# Altium PCB Main-Board-V1.1.PcbDoc (part 4 of 5)
Units mil, origin at the board's own origin, x right, y up, seen from the top; angles counter-clockwise.
Board outline 3599.72 x 1771.65 mil, 4 copper layers (Top Layer, Layer 1, Layer 2, Bottom Layer), stack 62.449 mil thick; 176 components, 132 nets, 634 pads, 296 vias.
Unrouted connection lines stored in the file: 17.
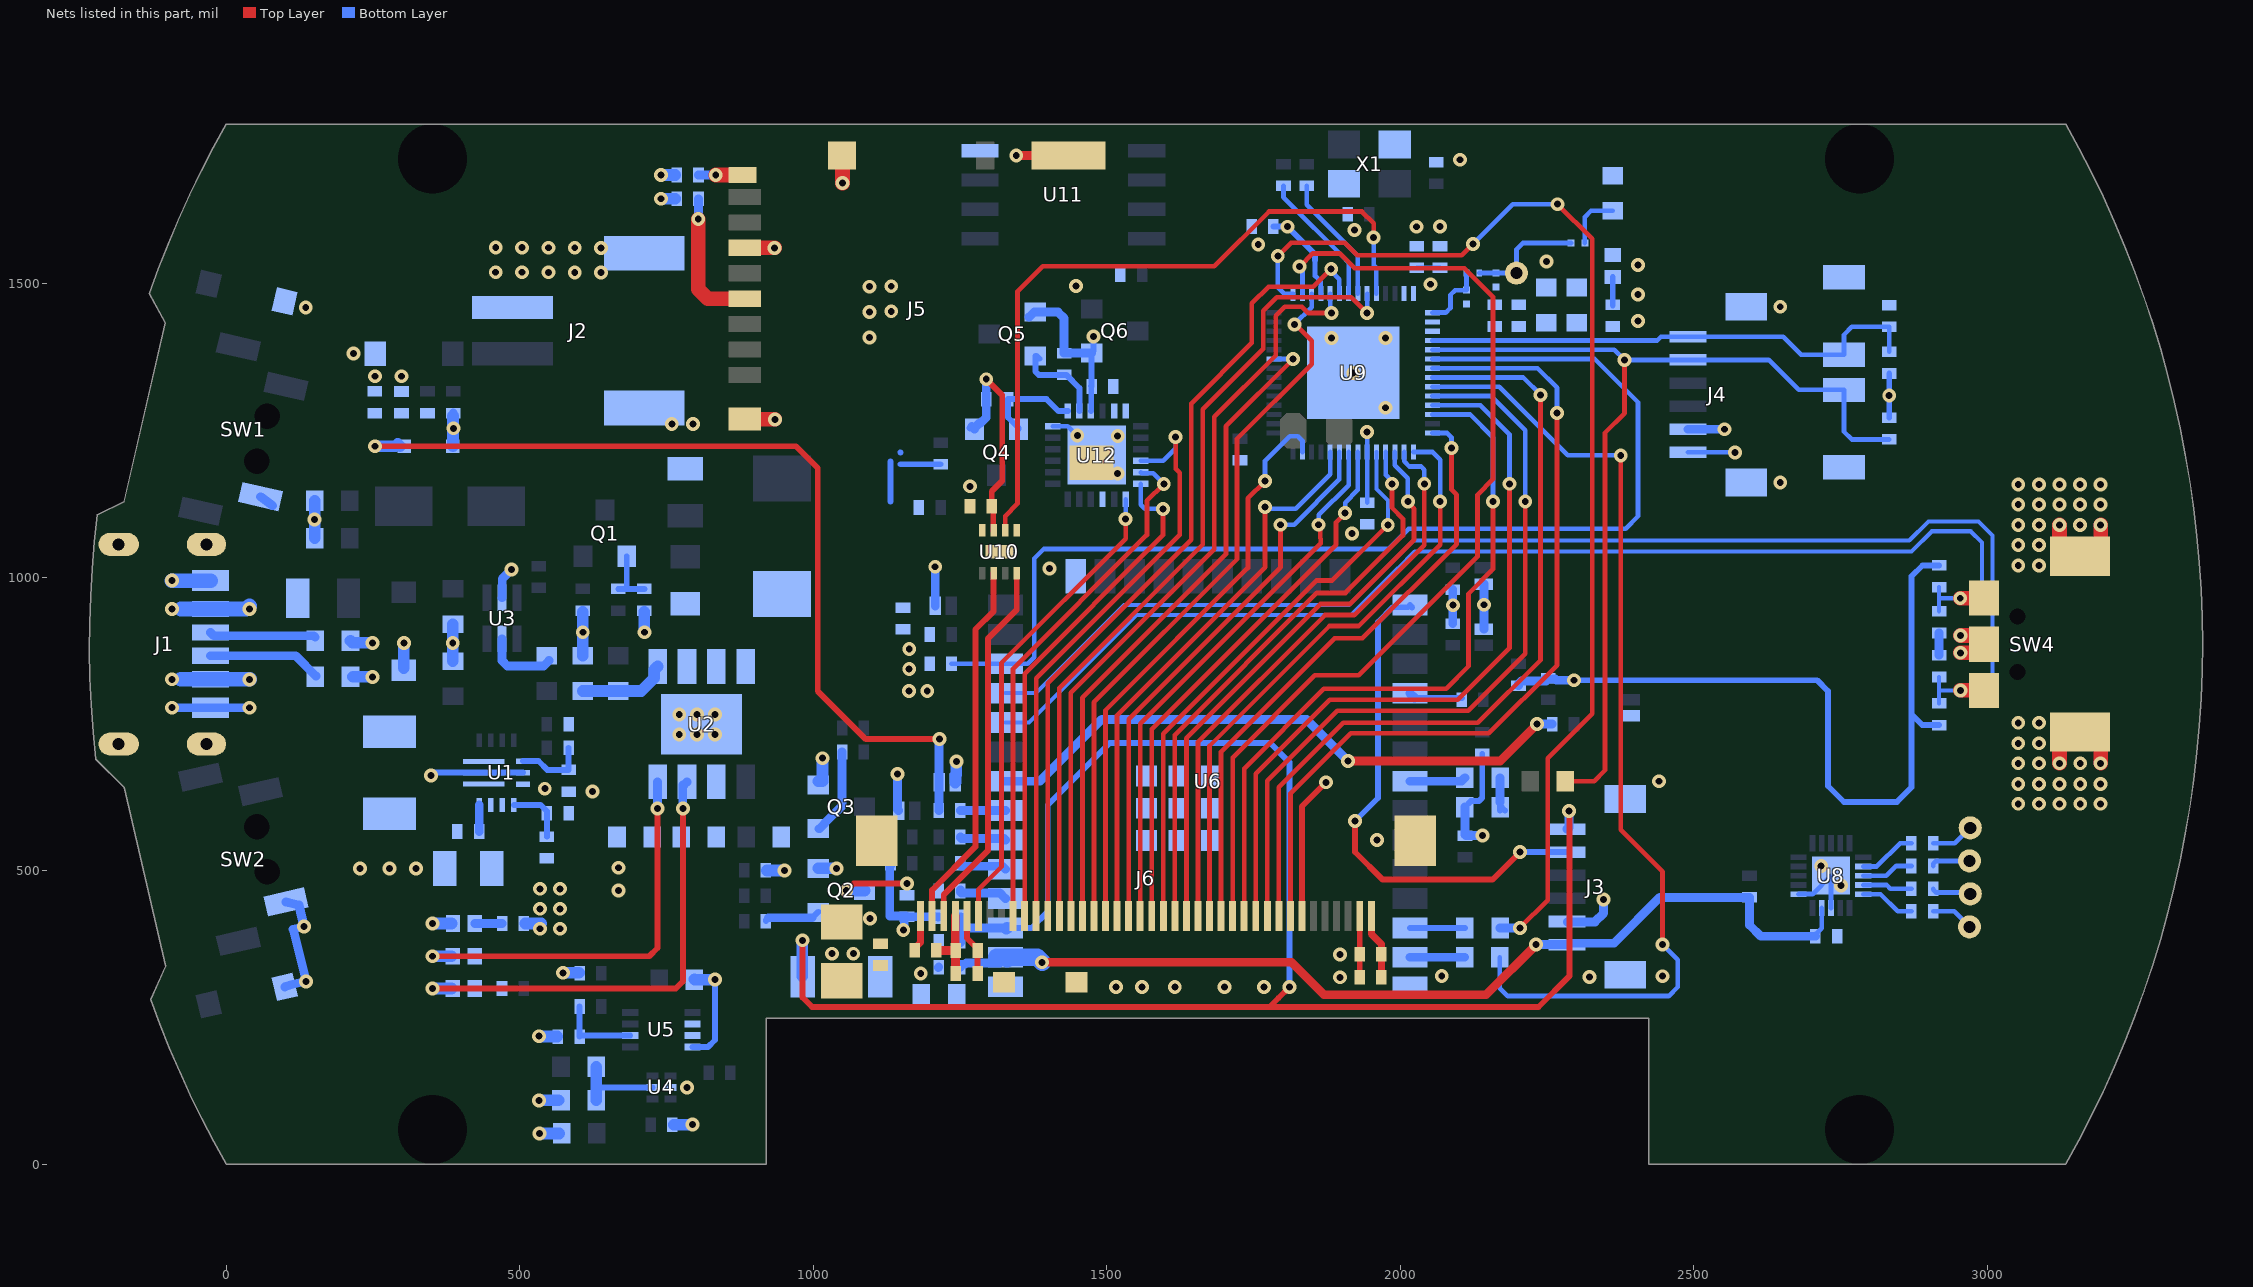
[diagram p4: the nets of this part, all layers, seen from the top]

## Via types
v1: diameter 23.62, hole 11.81, Top Layer to Bottom Layer, 296 vias

## Nets (pads, with @x,y where several pads share a name; then routed paths per layer and width w, separated by ;. In a path a pad name is that pad's centre, name@x,y a point inside that pad or via, vN(x,y) a via of type N, cw(c..) or ccw(c..) an arc to the next point about the centre after c; other vN are vias at no path point) (continued)
COM_UART_TX: (continued)
  Bottom Layer w8: U9.9@2054.84,1324.38 2168.33,1324.38 2285.24,1207.47 v1(2375.62,1207.47) ; R33.2@2169.69,352.36 2169.69,299.96 2183.21,286.44 2457.37,286.44 2472.75,301.82 2472.75,348.2 v1(2446.94,374.02)
EN: C19.1 J3.6 R32.1 SW3.1 U6.3 | length 3097.3
  Top Layer w10: v1(981.79,381.35) 981.79,284.17 998.15,267.8 1777.4,267.8 ; v1(1811.19,301.59) 1792.54,282.94 1777.4,267.8 ; v1(2287.7,601.91) 2288.15,601.46 2288.15,320.24 2235.71,267.8 1797.23,267.8 1777.4,267.8
  Bottom Layer w10: U6.3@1327.56,402.36 1329.98,402.36 1371.91,402.36 1399.54,429.99 1399.54,611.79 1505.21,717.46 1778.4,717.46 1811.19,684.67 v1(1811.19,301.59)
  Bottom Layer w15: v1@981.48,381.04 v1(981.79,381.35) ; C19.1@1250.82,377.36 C19.1@1250.82,379.51 1250.82,402.36 ; R32.1@1250.82,421.36 1250.82,402.36 ; U6.3@1327.56,402.36 1250.82,402.36 ; J3.6@2283.72,570.87 2285.36,570.87 2287.7,573.21 v1(2287.7,601.91)
  Bottom Layer w20: SW3.1@981.48,319.97 v1@981.48,381.04 ; U6.3@1328.77,401.15 1329.98,402.36 U6.3@1330.47,401.87
EN-2: C50.1 J4.6 R60.1 SW5.1 U9.4 | length 875.3
  Bottom Layer w8: U9.4@2054.84,1403.12 2437.94,1403.12 2444.24,1409.43 2652.45,1409.43 2682.88,1379 SW5.1@2756,1379 ; SW5.1@2755.57,1379.43 2756,1379.85 2756,1412.93 2769.53,1426.46 C50.1@2833.07,1426.45 R60.1@2833.08,1383.92
ENC_CHA: C23.2 R36.1 SW4.A U6.10 | length 2049.4
  Top Layer w15: SW4.A@2994.12,964 SW4.A@2994.69,964.57
  Top Layer w25: v1(2954,964) SW4.A@2994.12,964
  Bottom Layer w7: U6.10@1327.56,752.36 1367.66,752.36 1550.86,935.56 1915.95,935.56 1995.43,1015.05 1996.02,1015.05 2024.66,1043.69 2871.07,1043.69 2905.5,1078.12 2971.88,1078.12 2991,1059 2991,975.79 2979.21,964 v1(2954,964) 2918,964 ; C23.2@2918,941.87 2918,964 ; R36.1@2918,983 2918,964
ENC_CHB: C22.2 R35.1 SW4.B U6.11 | length 2243.8
  Top Layer w25: v1(2954.57,807.09) SW4.B@2994.69,807.09
  Bottom Layer w7: U6.11@1327.56,802.36 1379.73,802.36 1529.73,952.36 1912.95,952.36 2022.78,1062.19 2867.13,1062.19 2900.05,1095.12 2984.88,1095.12 3009,1071 3009,821.4 2994.69,807.09 v1(2954.57,807.09) 2918.51,807.09 ; R35.1@2918,785 C22.2@2918,829.93
GND: C1.1 C2.1 C3.1 C4.1 C5.1 C8.1 C9.1 C10.1 C11.2 C12.2 C13.1 C14.1 C15.1 C16.1 C17.1 C18.1 C19.2 C20.1 C21.1 C22.1 C23.1 C24.2 C25.1 C29.2 C30.2 C31.1 C32.1 C33.1 C34.1 C35.1 C36.1 C37.1 C38.1 C39.1 C40.1 C41.1 C42.1 C43.1 C44.1 C45.1 C46.2 C47.1 C48.1 C49.1 C50.2 C51.1 C52.1 C53.1 D1.1 D2.1 D3.1 D4.1 D6.1 D7.1 D8.1 D9.1 D10.1 D11.1 D12.1 J1.A12 J1.B12 J1.MH1 J1.MH2 J1.MH3 J1.MH4 J2.1 J2.MP1 J2.MP2 J3.2 J3.MP1 J3.MP2 J4.2 J4.MP1 J4.MP2 J5.6 J5.S1 J5.S2 J5.S3 J5.S4 J6.1 J6.7 J6.37 J6.MP1 J6.MP2 LED3.2 LED4.2 pad.SH Q2.2 Q3.2 R1.2 R3.2 R7.1 R10.1 R15.2 R19.1 R37.1 R38.1 R41.2 R66.1 R67.1 R70.1 SW1.2 SW2.2 SW3.2 SW4.4 SW4.5 SW4.C SW5.2 SW6.2 U1.2 U1.9 U1.10 U2.7 U2.9 U3.2 U4.2 U5.4 U6.1 U6.15 U6.38 U6.39 U6.40 U6.41 U6.42 U6.43 U6.44 U6.45 U6.46 U6.47 U8.8 U8.11 U8.21 U9.57 U10.1 U10.4 U10.9 U11.4 U12.9 U12.18 U12.23 U12.24 U12.25 X1.2 X1.4 | length 3155.9
  Top Layer w10: J6.7@1832.61,423 1832.61,609.51 v1(1873.64,650.54)
  Top Layer w12: J6.1@1950.72,423 1950.72,392.01 1967.72,375.01 1967.72,352.67 C52.1@1968.03,352.36 ; C53.1@1968.03,318.36 C52.1@1968.03,352.36 ; C52.1@1968.03,355.95 C52.1@1968.03,352.36
  Top Layer w15: J5.S2@1049.05,1718.48 J5.S2@1050,1717.53 ; C44.1@1209.73,364.15 C48.1@1242.24,364.15 ; C48.1@1242.06,365.08 J6.37@1242.06,423 ; C49.1@1243,324.76 1242.24,325.52 C48.1@1242.24,364.15 ; C48.1@1243,364.14 C48.1@1242.24,364.15 ; v1(1345.88,1718.25) 1434.65,1718.25 J5.S3@1434.87,1718.48
  Top Layer w25: J5.6@883.7,1561 v1(934,1561) ; J5.S1@884.19,1269.16 v1@934.5,1269.16 ; v1(1050,1671.23) J5.S2@1050,1717.53 ; v1(2954.57,871.12) SW4.C@2994.69,871.12 ; v1(2954.57,900.52) SW4.C@2994.69,900.52 ; v1(3123,682.88) SW4.5@3123,723 ; SW4.4@3123,1048.64 v1(3123,1088.77) ; v1(3193.15,682.88) SW4.5@3193.15,723 ; SW4.4@3193.14,1048.64 v1(3193.15,1088.77)
  Bottom Layer w8: U12.18@1407.89,1257.15 1433.78,1257.15 1449.66,1241.27 v1(1449.9,1241.27) ; U8.11@2678.61,459.98 2678.77,460.14 2702.39,460.14 U8.21@2733.73,491.47 U8.8@2733.73,436.36
  Bottom Layer w10: v1(349.16,661.93) 354.2,666.98 U1.2@438.69,666.98 U1.9@505.81,666.98 ; C11.2@385.97,919.65 C11.2@386.39,920.06 ; U5.4@794.58,199.43 820.56,199.43 832.77,211.64 v1(832.77,314.37) ; C16.1@797.43,314.31 C16.1@797.94,314.81 ; J3.2@2283.72,413.39 J3.2@2284.41,412.69
  Bottom Layer w15: v1@-92.51,777.59 v1@39.64,777.59 ; SW1.2@58.65,1137.04 SW1.2@79.44,1121.76 ; D3.1@99.86,302.06 110.15,305.52 v1(136.07,311.5) 114.14,400.03 114.07,400.33 v1(132.59,404.6) 124.13,441.26 SW2.2@102.05,446.64 ; D12.1@386,1223 D12.1@386.48,1223.47 ; C13.1@386.7,1274.65 386.7,1279.24 C13.1@386.95,1279.5 ; U3.2@470,965.04 470.2,965.24 470.2,997.17 v1(485.75,1012.73) ; v1(1143.63,664.76) 1143.63,604.1 D10.1@1145.37,602.36 ; D6.1@1207.8,951.12 v1(1207.82,1017.67) ; C20.1@1212.99,334.83 C20.1@1213.82,335.66 ; D7.1@2142.69,911.42 v1(2142.69,952.95) D9.1@2142.69,988.17 ; J3.2@2284.41,412.69 2331.58,412.69 2346.53,427.65 v1(2346.53,450.91) ; J4.2@2490.3,1251.95 v1(2552.21,1251.95) ; C22.1@2918,866.93 C23.1@2918,904.87
  Bottom Layer w20: C8.1@150.76,1066.54 v1(150.76,1098.29) C9.1@150.76,1130.04 ; R3.2@211.76,891.65 215.32,888.09 v1(249.23,888.09) ; R1.2@215.92,830.15 v1(249.23,830.15) ; D1.1@302.65,845.38 v1(302.65,888.09) ; v1(351.65,410) LED3.2@383.71,410 ; C12.2@385.97,857.06 v1(385.97,888.09) C11.2@385.97,919.65 ; D12.1@386.48,1223.47 386.48,1274.43 C13.1@386.7,1274.65 ; v1(533,108.72) R15.2@566.31,108.72 ; v1(533,218) 533.39,217.61 C14.1@563.97,217.61 ; v1(534,52.31) C17.1@567.31,52.31 ; v1@574.22,326.24 C15.1@601.04,326.24 ; R7.1@607.5,866.06 v1(607.5,906.16) R37.1@607.5,940.72 ; v1(712.37,906.16) R19.1@712.37,941.09 ; v1(741,1644.61) C24.2@765.06,1644.61 ; v1(741,1685.01) R38.1@765.06,1685.01 ; C18.1@762.52,67.31 v1(794.58,67.31) ; C16.1@797.94,314.81 798.41,314.34 v1(832.77,314.37) ; C2.1@921.24,500.45 v1(951.35,500.45) ; Q2.2@1008.73,503.9 v1(1039.84,503.9) ; Q3.2@1008.73,652.26 1015.58,652.26 1015.73,652.41 v1(1015.73,691.57) ; D11.1@1242.1,650.36 1242.26,650.52 1242.26,662.19 1243.57,663.5 v1@1243.57,685.38
  Bottom Layer w25: v1@-92.53,994.09 J1.A12@-26.45,994.09
  other v1: 784.94,130.57 1615.98,301.59 1700.62,301.59 1767.65,301.59 2322.23,318.85 2070.8,320.6 2446.94,320.24 1183.27,324.86 573.97,325.98 1096.84,418.4 668.4,466 2750.58,474.72 228.05,503.86 277.97,503.86 323.24,503.86 668.4,505 2717.14,507.93 1960.53,552.36 3052.85,613.88 3088.24,613.88 3123,613.88 3158.39,613.88 3193.15,613.88 624.14,634.7 542.77,639.6 3052.85,647.94 3088.24,647.94 3123,647.94 3158.39,647.94 3193.15,647.94 2440.89,652.36 3052.85,682.88 3088.24,682.88 3158.39,682.88 1244.08,685.89 3052.85,716.94 3088.24,716.94 771.88,731.94 801.94,731.94 832.77,731.94 3052.85,751.87 3088.24,751.87 771.88,766 801.94,766 832.77,766 -92.54,777.63 39.64,777.49 -92.54,994.16 1402.36,1015.05 3052.85,1019.77 3088.24,1019.77 3052.85,1054.71 3088.24,1054.71 1917.93,1074.32 3052.85,1088.77 3088.24,1088.77 3157.76,1088.77 3052.85,1123.7 3088.24,1123.7 3123,1123.7 3157.76,1123.7 3193.15,1123.7 1267.07,1154.76 3052.85,1157.76 3088.24,1157.76 3123,1157.76 3157.76,1157.76 3193.15,1157.76 2647.43,1161 1518.75,1176.68 1518.75,1240.33 386.95,1253.58 759.15,1260.85 795,1260.85 935,1268.66 1975.02,1288.55 253.66,1342.27 298.54,1342.2 1919.9,1348 217,1381 1882.76,1407.45 1975.02,1407.45 135.6,1459.11 2647.43,1460.61 1447.63,1495.7 638.64,1519.13 459.12,1519.44 504,1519.36 548.88,1519.29 593.76,1519.21 2404.86,1531.92 2249,1537.69 593.83,1561.09 638.71,1561.01 459.2,1561.32 504.08,1561.24 548.95,1561.16 1758.17,1566.54 1922.14,1591.23 2028.03,1596.87 2067.64,1597.24 2102.07,1711
II2C_SCL: Q4.2 R57.2 U12.19 | length 168.9
  Bottom Layer w10: Q4.2@1349.75,1252.15 1349.75,1254.12 1331.84,1272.03 R57.2@1331.84,1303.28 1397.41,1303.28 1417.65,1283.04 U12.19@1433.78,1283.04
II2C_SDA: Q5.2 R59.2 U12.20 | length 157.7
  Bottom Layer w10: Q5.2@1385.28,1372.13 1380.42,1376.98 Q5.2@1378.45,1376.98 1378.45,1350.49 1384.31,1344.63 1408.77,1344.63 R59.2@1427.48,1344.63 ; R59.2@1430.98,1344.63 1453.46,1322.15 U12.20@1453.46,1283.04
IO0: J3.5 U6.25 | length 879.4
  Top Layer w10: v1(1922.94,584.65) 1922.94,531.94 1970.23,484.65 2157.15,484.65 v1(2204,531.5)
  Bottom Layer w10: v1(1922.94,584.65) 1962,623.71 1962,923.72 1987.01,948.73 2012.9,948.73 U6.25@2016.54,952.36 U6.25@2020.28,948.61 ; v1(2204,531.5) J3.5@2283.72,531.5
IO0-2: J4.5 R61.1 R62.2 SW6.1 U9.5 | length 1671
  Top Layer w8: R62.2@2281.43,652.36 2330.16,652.36 2348.86,671.06 2348.86,1245.92 2382.16,1279.22 v1(2382.16,1370.06)
  Bottom Layer w8: U9.5@2054.84,1387.37 2364.85,1387.37 v1(2382.16,1370.06) J4.5@2490.3,1370.06 2627.94,1370.06 2679,1319 SW6.1@2756,1319 2756,1248.08 2769.52,1234.56 R61.1@2833.08,1234.56
LCD_CS: J6.30 U12.4 | length 1007.8
  Top Layer w8: J6.30@1379.85,423 1379.85,827.42 1624.37,1071.94 1624.37,1177.46 1617.49,1184.34 v1(1617.49,1239.01)
  Bottom Layer w8: U12.4@1558.09,1198.1 1595.97,1198.1 1617.49,1219.62 v1(1617.49,1239.01)
LCD_DB0: J6.25 U9.45 | length 1238.8
  Top Layer w8: J6.25@1478.28,423 1478.28,786.66 1721.96,1030.34 1721.96,1235.82 1849.13,1362.99 1849.13,1402.76 1821.46,1430.43 v1(1819.76,1430.43)
  Bottom Layer w8: v1(1819.76,1430.43) 1849.13,1459.8 U9.45@1849.13,1482.84
LCD_DB1: J6.24 U9.27 | length 991.2
  Top Layer w8: J6.24@1497.96,423 1497.96,773.03 1740.55,1015.62 1740.55,1134.42 v1(1769.72,1163.6)
  Bottom Layer w8: v1(1769.72,1163.6) 1769.72,1198.18 1811.83,1240.28 1825.29,1240.28 1833.39,1232.19 U9.27@1833.39,1213.16
LCD_DB2: J6.23 U9.24 | length 975.4
  Top Layer w8: J6.23@1517.65,423 1517.65,764.56 1769.72,1016.63 v1(1769.72,1119.5)
  Bottom Layer w8: v1(1769.72,1119.5) 1772.71,1116.51 1822.07,1116.51 1880.63,1175.08 U9.24@1880.63,1213.16
LCD_DB3: J6.22 U9.23 | length 952.4
  Top Layer w8: J6.22@1537.33,423 1537.33,757.98 1796.1,1016.75 v1(1796.1,1089.3)
  Bottom Layer w8: v1(1796.1,1089.3) 1819.17,1089.3 1896.38,1166.51 U9.23@1896.38,1213.16
LCD_DB4: J6.21 U9.22 | length 940.5
  Top Layer w8: J6.21@1557.02,423 1557.02,749.96 1864.5,1057.44 1864.5,1065.44 1863.54,1066.4 1863.54,1086.31 v1(1860.55,1089.3)
  Bottom Layer w8: v1(1860.55,1089.3) 1861.44,1090.19 1861.44,1106.08 1912.13,1156.76 U9.22@1912.13,1213.16
LCD_DB5: J6.20 U9.21 | length 935.6
  Top Layer w8: J6.20@1576.7,423 1576.7,741.24 1890.68,1055.21 1890.68,1093.75 v1(1906.11,1109.18)
  Bottom Layer w8: v1(1906.11,1109.18) 1906.16,1109.23 1906.16,1126.81 1927.87,1148.53 U9.21@1927.87,1213.16
LCD_DB6: J6.19 U9.19 | length 972.4
  Top Layer w8: J6.19@1596.39,423 1596.39,733.28 1857.44,994.33 1884.36,994.33 v1(1978.85,1088.82)
  Bottom Layer w7: U9.19@1959.37,1213.16 1959.37,1149.83 1978.85,1130.35 v1(1978.85,1088.82)
LCD_DB7: J6.18 U9.18 | length 991.8
  Top Layer w8: J6.18@1616.07,423 1616.07,731.02 1858.19,973.13 1906.72,973.13 2004.66,1071.08 2004.66,1099.51 1986,1118.17 v1(1986,1159)
  Bottom Layer w8: U9.18@1975.12,1213.16 1975.12,1174.11 1986,1163.23 v1(1986,1159)
LCD_DB8: J6.17 U9.17 | length 993.7
  Top Layer w8: J6.17@1635.76,423 1635.76,725.73 1864.15,954.12 1914.28,954.12 2023.61,1063.46 2023.61,1116.5 2013,1127.12 v1(2013,1129)
  Bottom Layer w8: U9.17@1990.87,1213.16 1990.87,1190.82 2013,1168.69 v1(2013,1129)
LCD_DB9: J6.16 U9.16 | length 1005.1
  Top Layer w8: J6.16@1655.44,423 1655.44,719.02 1871.87,935.44 1921.87,935.44 2041,1054.57 v1(2041,1159)
  Bottom Layer w8: U9.16@2006.61,1213.16 2006.94,1212.83 2006.94,1197.31 2015.75,1188.5 2035.69,1188.5 2041,1183.19 v1(2041,1159)
LCD_DB10: J6.15 U9.15 | length 1020.2
  Top Layer w8: J6.15@1675.13,423 1675.13,712.37 1879.53,916.77 1929.47,916.77 2068,1055.3 v1(2068,1129)
  Bottom Layer w8: U9.15@2022.36,1213.16 2055.03,1213.16 2068,1200.19 v1(2068,1129)
LCD_DB11: J6.14 U9.14 | length 1048.2
  Top Layer w8: J6.14@1694.81,423 1694.81,702.71 1888.16,896.06 1935.67,896.06 2096,1056.38 2096,1140.43 2087.42,1149.01 v1(2087.42,1220.14)
  Bottom Layer w8: U9.14@2054.84,1245.64 2079.53,1245.64 2087.38,1237.78 2087.38,1220.18 v1(2087.42,1220.14)
LCD_DB12: J6.13 U9.44 | length 1704.1
  Top Layer w8: J6.13@1714.5,423 1714.5,692.7 1854.79,832.99 1929.46,832.99 2131.8,1035.32 2131.8,1140.55 2158,1166.75 2158,1477.79 2109.44,1526.34 1922.2,1526.34 1897.07,1551.47 1850.81,1551.47 v1(1828.45,1529.11)
  Bottom Layer w8: v1@1831.44,1526.12 v1(1828.45,1529.11) 1828.45,1524.88 1833.39,1519.95 U9.44@1833.39,1482.84
LCD_DB13: J6.12 U9.12 | length 1231.8
  Top Layer w8: J6.12@1734.18,423 1734.18,673.95 1870.11,809.88 2078.19,809.88 2116.32,848.01 2116.32,971.96 2158,1013.63 v1(2158,1129)
  Bottom Layer w8: U9.12@2054.84,1277.13 2118.87,1277.13 2158,1238 v1(2158,1129)
LCD_DB14: J6.11 U9.11 | length 1278.8
  Top Layer w8: J6.11@1753.87,423 1753.87,664.71 1880.28,791.11 2098.12,791.11 2186,879 v1(2186,1159)
  Bottom Layer w8: U9.11@2054.84,1292.88 2136.71,1292.88 2186,1243.59 v1(2186,1159)
LCD_DB15: J6.10 U9.10 | length 1322.2
  Top Layer w8: J6.10@1773.55,423 1773.55,653.06 1892.67,772.17 2115.87,772.17 2213,869.3 v1(2213,1129)
  Bottom Layer w8: U9.10@2054.84,1308.63 2154.27,1308.63 2213,1249.9 v1(2213,1129)
LCD_DB16: J6.9 U9.8 | length 1402.9
  Top Layer w8: J6.9@1793.24,423 1793.24,642.32 1902.92,752 2132.14,752 2239.02,858.88 v1(2239.02,1310.54)
  Bottom Layer w8: U9.8@2054.84,1340.13 2209.43,1340.13 v1(2239.02,1310.54)
LCD_DB17: J6.8 U9.7 | length 1451.9
  Top Layer w8: J6.8@1812.92,423 1812.92,631.29 1915.54,733.91 2151.13,733.91 2267.22,849.99 v1(2267.22,1279.76)
  Bottom Layer w8: U9.7@2054.84,1355.87 2233.87,1355.87 2267.22,1322.52 v1(2267.22,1279.76)
LCD_DE: J6.28 U9.51 | length 1405.6
  Top Layer w8: J6.28@1419.22,423 1419.22,811.12 1663.74,1055.63 1663.74,1286.05 1766.45,1388.76 1766.45,1453.82 1789.55,1476.93 1916.57,1476.93 v1(1943.62,1449.87)
  Bottom Layer w8: v1(1943.62,1449.87) U9.51@1943.62,1482.84
LCD_HSYNC: J6.26 U9.37 | length 1129.8
  Top Layer w8: J6.26@1458.59,423 1458.59,794.81 1703.11,1039.32 1703.11,1257.09 v1(1817.64,1371.62)
  Bottom Layer w8: U9.37@1785.16,1371.62 v1(1817.64,1371.62)
LCD_PCLK: J6.29 U9.48 | length 1394.8
  Top Layer w8: J6.29@1399.54,423 1399.54,819.27 1644.05,1063.79 1644.05,1295.71 1747.31,1398.97 1747.31,1466.28 1775.7,1494.66 1852.06,1494.66 v1(1882.44,1525.03)
  Bottom Layer w8: v1(1882.44,1525.03) 1882.44,1521.58 1896.38,1507.64 U9.48@1896.38,1482.84
LCD_RESET: J6.35 U12.7 | length 813.7
  Top Layer w8: J6.35@1281.43,423 1281.43,467.54 1320.8,506.91 1320.8,853.8 1532.2,1065.2 v1(1532.2,1099.35)
  Bottom Layer w8: v1(1532.2,1099.35) U12.7@1532.2,1132.84
LCD_SCK: J6.31 U12.6 | length 866.8
  Top Layer w8: J6.31@1360.17,423 1360.17,835.58 1595.81,1071.22 v1@1595.81,1116.11
  Bottom Layer w8: U12.6@1558.09,1158.73 1558.09,1123.24 1564.96,1116.37 v1(1595.81,1116.37)
LCD_SDA: J6.32 U12.5 | length 889.4
  Top Layer w8: J6.32@1340.48,423 1340.48,843.73 1568.61,1071.85 1568.61,1129.84 1597.24,1158.48 v1(1597.24,1158.73)
  Bottom Layer w8: U12.5@1558.09,1178.41 1559.6,1176.9 1579.08,1176.9 v1(1597.24,1158.73)
LCD_VSYNC: J6.27 U9.47 | length 1306
  Top Layer w8: J6.27@1438.91,423 1438.91,802.96 1683.42,1047.48 1683.42,1273.2 1787.79,1377.57 1787.79,1445.19 1803.26,1460.66 1832.62,1460.66 1843.41,1449.87 v1@1882.38,1449.87
  Bottom Layer w8: U9.47@1880.63,1482.84 1880.96,1482.51 1880.96,1451.67 v1(1882.76,1449.87)
LEDK1: J6.39 U10.6 | length 627.2
  Top Layer w10: J6.39@1202.69,423 1202.69,467.21 1276.22,540.75 1276.22,910.65 1307.34,941.77 U10.6@1307.34,1006.84
LEDK2: J6.38 U10.8 | length 635.3
  Top Layer w10: J6.38@1222.37,423 1222.37,459.06 1298.03,534.72 1298.03,895.76 1346.71,944.44 U10.8@1346.71,1006.84
MCU_INT: R49.2 U6.12 U9.6 | length 1947
  Bottom Layer w8: R49.2@1235.58,852.36 U6.12@1327.56,852.36 1365.56,852.36 1376.55,863.35 1376.55,1031.79 1392.73,1047.97 1979.68,1047.97 2014.25,1082.54 2383.87,1082.54 2405.06,1103.72 2405.06,1297.55 2330.98,1371.62 U9.6@2054.84,1371.62
NetC6_1: C6.1 C35.2 L2.1 TP5.1 | length 200.7
  Bottom Layer w8: L2.1@2134.71,1518 C35.2@2163,1518 TP5.1@2198,1518 2198,1557.99 2209.1,1569.09 C6.1@2290.8,1569.09
NetC6_2: C6.2 R70.2 | length 96.3
  Bottom Layer w8: C6.2@2314.42,1569.09 2314.42,1613.45 2324.97,1624 R70.2@2362.01,1624
NetC14_2: C14.2 R14.2 U5.6 | length 138.4
  Bottom Layer w10: R14.2@601.97,268.49 C14.2@601.97,217.21 603.88,219.12 U5.6@688.28,219.12
NetC36_2: C36.2 L2.2 U9.1 | length 116.5
  Bottom Layer w8: U9.1@2054.84,1450.36 2055.17,1450.69 2077.77,1450.69 2085.65,1458.58 2085.65,1481.06 2093.39,1488.8 C36.2@2113.06,1488.8 L2.2@2113.06,1518
NetF1_1: F1.1 J1.A9 J1.B9 | length 235.4
  Bottom Layer w15: J1.B9@-26.45,825.98 J1.B9@-26.38,825.91
  Bottom Layer w25: -76.89,825.98 J1.B9@-26.45,825.98 ; -76.89,945.67 34.45,945.67 v1@39.71,950.93 ; J1.B9@-26.38,825.91 39.64,825.91 v1(39.71,825.84)
  other v1: -92.48,825.98 -92.54,945.74 39.71,945.74
NetJ1_A5: J1.A5 R1.1 | length 193.8
  Bottom Layer w15: J1.A5@-26.45,866.14 118.27,866.14 R1.1@153.01,831.4
NetJ1_B5: J1.B5 R3.1 | length 181.5
  Bottom Layer w15: J1.B5@-26.45,905.51 -21.18,900.23 149.03,900.23 R3.1@151.76,897.5
NetJ5_SW-B: J5.SW-B R38.2 | length 75.2
  Top Layer w25: v1(834,1685.01) J5.SW-B@879.76,1685.01
  Bottom Layer w15: R38.2@804.56,1685.01 v1(834,1685.01)
NetL1_1: L1.1 U2.8
NetL3_1: L3.1 U1.3
NetL3_2: L3.2 U1.1
NetLED1_1: LED1.1 LED2.1 R4.1
NetLED1_2: LED1.2 U2.3 | length 807.1
  Top Layer w10: v1(351.6,299.17) 765.77,299.17 778.06,311.46 778.06,604.18 v1@779.9,606.02
  Bottom Layer w15: v1@777.71,607.67 U2.3@777.71,645.99 ; v1(778.06,606.02) v1@779.71,607.67 ; U2.3@779.71,645.99 U2.3@785,651.28
  Bottom Layer w20: v1(351.6,299.17) LED1.2@383.66,299.17
NetLED2_2: LED2.2 U2.4 | length 704.3
  Top Layer w10: v1(351.6,354.17) 720.85,354.17 734.9,368.22 v1(734.9,606.02)
  Bottom Layer w15: v1(734.9,606.02) 735,606.02 U2.4@735,651.28
  Bottom Layer w20: v1(351.6,354.17) LED2.2@383.66,354.17
NetLED3_1: LED3.1 R39.2 | length 46.3
  Bottom Layer w15: LED3.1@423.7,410 R39.2@470,410
NetLED4_1: LED4.1 R20.2 | length 48.4
  Bottom Layer w10: R20.2@2362,1463.01 LED4.1@2362,1511.38
NetQ1_1: Q1.1 R18.2 R19.2 | length 100
  Bottom Layer w10: R18.2@668,980.04 682.37,980.04 ; Q1.1@682.37,1035.6 682.37,980.04 ; R19.2@712.37,980.04 682.37,980.04
NetQ2_1: Q2.1 R23.2 | length 97.1
  Bottom Layer w10: R23.2@919.29,413.96 919.29,415.7 R23.2@923.29,419.7 ; Q2.1@998.33,419.7 Q2.1@1008.73,430.1
  Bottom Layer w15: R23.2@923.29,419.7 Q2.1@998.33,419.7
NetQ3_1: Q3.1 R24.2 | length 147.3
  Bottom Layer w15: Q3.1@1009.91,571.46 1010.69,571.46 1019.34,580.1 1019.34,580.88 1049.18,610.73 R24.2@1049.18,702.06
NetR2_2: R2.2 U6.8 | length 1030.6
  Top Layer w15: v1(1911.25,686.62) 2170.01,686.62 v1(2233,749.6)
  Bottom Layer w15: U6.8@1327.56,652.36 1386.15,652.36 1491.47,757.68 1840.19,757.68 v1(1911.25,686.62) ; v1@2233,749.6 R2.2@2259.04,749.6
NetR6_1: R6.1 U2.6
NetR8_1: R8.1 R10.2
NetR8_2: R8.2 U2.2
NetR12_1: R12.1 U3.5 | length 125.2
  Bottom Layer w15: U3.5@470,894.96 470,857.47 478.79,848.68 540.71,848.68 R12.1@550.15,858.12
NetR15_1: R15.1 R16.1 U4.5 | length 152.8
  Bottom Layer w10: 630.47,130.81 U4.5@726.28,130.81
  Bottom Layer w20: R15.1@630.47,108.72 630.47,130.81 R16.1@630.47,165.72
NetR25_2: R25.2 U6.4 | length 85
  Bottom Layer w15: R25.2@1250.82,467.36 1250.82,463.86 1252.55,462.13 1317.79,462.13 U6.4@1327.56,452.36
NetR26_1: R26.1 U6.36 | length 93.7
  Bottom Layer w10: U6.36@2016.54,402.36 R26.1@2110.2,402.36
NetR27_2: R27.2 U6.5 | length 82.9
  Bottom Layer w15: R27.2@1250.83,512.36 1250.83,508.86 1252.33,507.36 1322.56,507.36 U6.5@1327.56,502.36
NetR28_2: R28.2 U6.6 | length 79.4
  Bottom Layer w15: R28.2@1250.83,557.36 1250.83,556.36 1252.33,554.86 1325.06,554.86 U6.6@1327.56,552.36
NetR29_2: R29.2 U6.7 | length 76.7
  Bottom Layer w15: R29.2@1250.82,602.36 U6.7@1327.56,602.36
NetR30_1: R30.1 U6.31 | length 96.2
  Bottom Layer w15: U6.31@2016.54,652.36 2104.2,652.36 R30.1@2110.2,658.36
NetR30_2: R30.2 R31.1 | length 61.6
  Bottom Layer w10: R31.1@2170.2,602.36 2170.2,610.54 R31.1@2178.38,602.36
  Bottom Layer w15: R31.1@2170.2,616.54 R30.2@2170.2,658.36
NetR33_1: R33.1 U6.37 | length 109.5
  Bottom Layer w15: U6.37@2016.54,352.36 2060.7,352.36 ; 2077,352.36 2060.7,352.36 ; R33.1@2109.69,352.36 2060.7,352.36
NetR46_1: R46.1 U6.28 | length 92.1
  Bottom Layer w10: U6.28@2024.51,794.39 R46.1@2105.31,794.39
  Bottom Layer w15: U6.28@2016.54,802.36 U6.28@2024.51,794.39
NetR50_1: R50.1 TP1.1 | length 72.7
  Bottom Layer w8: R50.1@2907.88,430.64 2943.44,430.64 TP1.1@2969.73,404.36
NetR50_2: R50.2 U8.5 | length 94.2
  Bottom Layer w8: U8.5@2788.84,459.98 2818.14,459.98 2847.47,430.64 R50.2@2870.88,430.64
NetR51_1: R51.1 TP2.1 | length 67.7
  Bottom Layer w8: R51.1@2907.87,469.35 2907.87,467.75 2912.87,462.75 2968.86,462.75 TP2.1@2971.04,460.57
NetR51_2: R51.2 U8.4 | length 84.7
  Bottom Layer w8: U8.4@2788.84,475.73 2789.02,475.55 2828.77,475.55 2834.97,469.35 R51.2@2870.87,469.35
NetR52_1: R52.1 TP3.1 | length 67.5
  Bottom Layer w8: R52.1@2907.87,508.06 2907.87,511.56 2912.87,516.56 2969.49,516.56 TP3.1@2969.73,516.79
NetR52_2: R52.2 U8.3 | length 88.9
  Bottom Layer w8: U8.3@2788.84,491.47 2828.21,491.47 2844.79,508.06 R52.2@2870.87,508.06
NetR53_1: R53.1 TP4.1 | length 74
  Bottom Layer w8: R53.1@2907.87,546.76 2944.8,546.76 TP4.1@2971.04,573
NetR53_2: R53.2 U8.2 | length 98.4
  Bottom Layer w8: U8.2@2788.84,507.22 2811.96,507.22 2851.5,546.76 R53.2@2870.87,546.76
NetR55_1: R55.1 U9.49 | length 229.7
  Bottom Layer w8: R55.1@1801.02,1666.55 1801.02,1647.2 1907.94,1540.29 1907.94,1539.51 1912.13,1535.32 U9.49@1912.13,1482.84
NetR64_1: R64.1 R66.2 U1.11 | length 104
  Bottom Layer w10: U1.11@490.07,611.86 535.66,611.86 546.37,601.15 R66.2@546.37,597.65 R64.1@546.37,557.86
NetR65_1: R65.1 R67.2 U1.8 | length 121.5
  Bottom Layer w10: U1.8@505.81,686.66 532.07,686.66 547.03,671.7 R67.2@583.37,671.7 R65.1@583.37,709.41
NetR68_1: R68.1 U9.50 | length 219.8
  Bottom Layer w8: R68.1@1840.82,1666.55 1840.82,1634.33 1927.87,1547.28 U9.50@1927.87,1482.84
NetU5_2: U5.2 U5.3
NTC: R5.1 R7.2 U2.5 | length 153
  Bottom Layer w20: R7.2@607.5,806.06 707.09,806.06 729.21,828.18 729.21,842.15 U2.5@735,847.93
PB1_ILV: Q2.3 R21.1 R25.1 | length 139.8
  Top Layer w10: v1(1056.35,466.06) 1057.03,466.06 1069.02,478.05 v1(1159.65,478.05)
  Bottom Layer w15: Q2.3@1087.47,466.06 Q2.3@1087.47,466.5
  Bottom Layer w20: v1(1056.35,466.06) Q2.3@1087.47,466.06